# Altium PCB PCB1.PcbDoc (part 2 of 2)
Units mil, origin at the board's own origin, x right, y up, seen from the top; angles counter-clockwise.
Board outline 2100 x 2250 mil, 4 copper layers (Top Layer, GND1, GND2, Bottom Layer), stack 23.756 mil thick; 82 components, 47 nets, 265 pads, 106 vias.
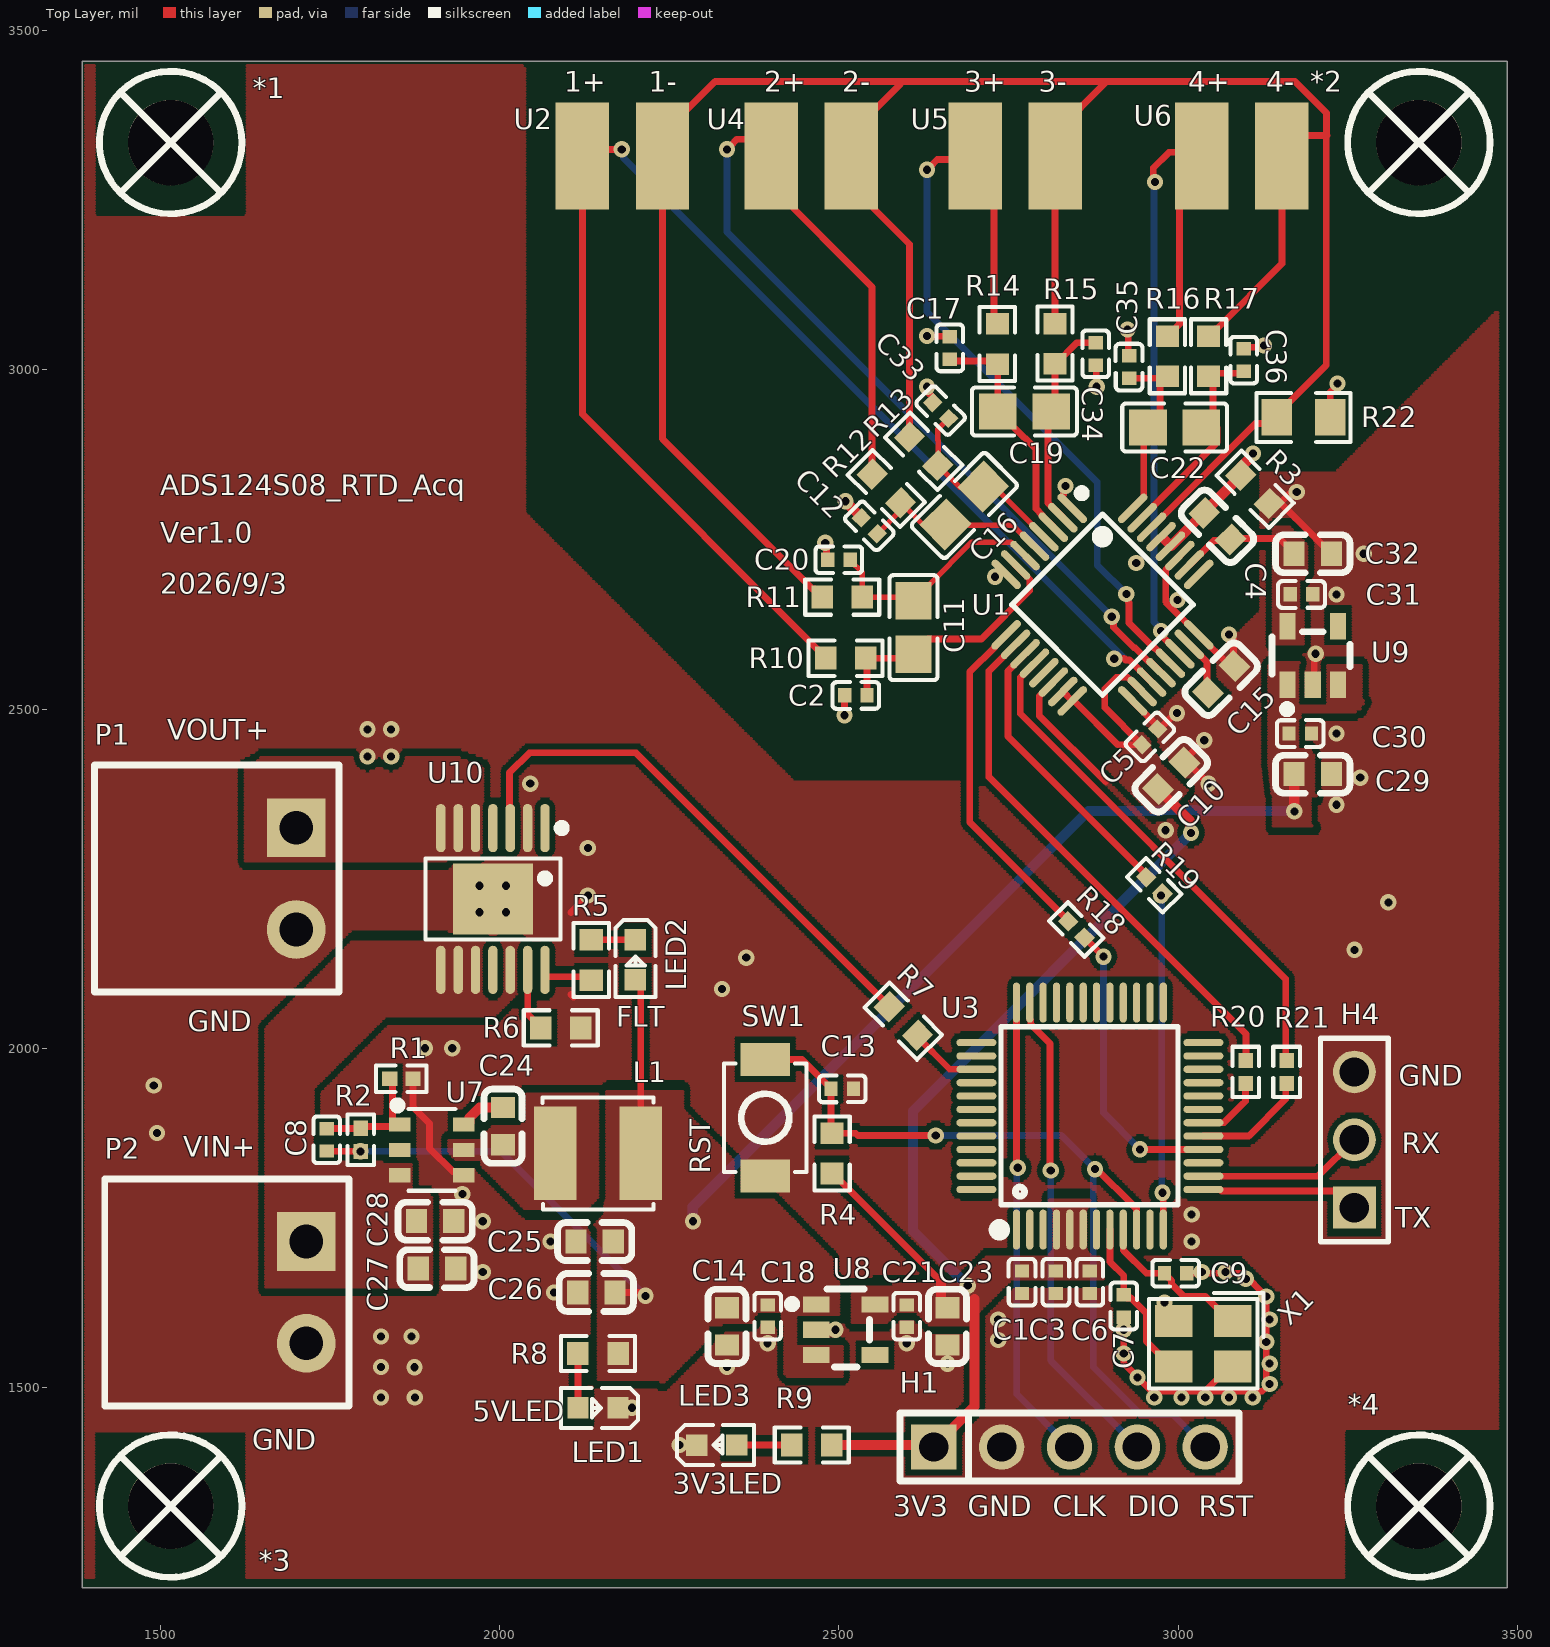
[diagram p0: Top Layer view]

## Polygon pours and split planes (outlines as drawn) (continued)
3V3 on Top Layer "NONET_L-01_P-001" (hatched Horizontal grid 4 track 5, remove dead copper, pour order 3): 2515,1650 2520,1645 2520,1595 2570,1595 2585,1610 2615,1610 2635,1590 2700,1590 2700,1605 2755,1660 2890,1660 2890,1690 2885,1695 2870,1695 2870,1780 2810,1780 2810,1700 2805,1695 2720,1695 2680,1655
GND on Bottom Layer "NONET_L-01_P-001" (hatched Horizontal grid 4 track 5, remove dead copper, pour order 37): 1388.11,3450 1388.11,1222.24 3475,1222.24 3475,3450
GND on GND1 "NONET_L-01_P-001" (hatched Horizontal grid 4 track 5, remove dead copper, pour order 44): 1395,3455 1395,1217.5 3475,1217.5 3475,3455
GND on GND2 "NONET_L-01_P-001" (hatched Horizontal grid 4 track 5, remove dead copper, pour order 43): 1395,3450 1395,1217.5 3475,1217.5 3475,3450

## Other copper
Top Layer:
  pour cut-out: 2028.96,3456.04 2040,3445 2040,2790.44 2434.4,2396.04 2873.96,2396.04 2873.96,2401.04 3118.96,2646.04 3118.96,2851.04 3230.6,2851.04 3468.96,3089.4 3468.96,3446.04 3463.96,3451.04
  pour cut-out: 3247.26,1434.19 3247.26,1214.19 3467.26,1214.19 3467.26,1434.19
  pour cut-out: 1404.1,1431.96 1404.1,1211.96 1624.1,1211.96 1624.1,1431.96
  pour cut-out: 3245,3450 3245,3230 3465,3230 3465,3450
  pour cut-out: 1405,3450 1405,3230 1625,3230 1625,3450
  pour cut-out: 2905,1620 2905,1525 2960,1470 3125,1470 3125,1475 3155,1505 3150,1510 3150,1640 3145,1640 3095,1690 3005,1690
GND1:
  pour cut-out: 3245,1435 3245,1215 3465,1215 3465,1435
  pour cut-out: 1405.68,1431.24 1405.68,1211.24 1625.68,1211.24 1625.68,1431.24
  pour cut-out: 1405,3450 1405,3230 1625,3230 1625,3450
  pour cut-out: 3245,3450 3245,3230 3465,3230 3465,3450
GND2:
  pour cut-out: 3247.26,1434.19 3247.26,1214.19 3467.26,1214.19 3467.26,1434.19
  pour cut-out: 1405.07,1431.23 1405.07,1211.23 1625.07,1211.23 1625.07,1431.23
  pour cut-out: 1405.39,3448.2 1405.39,3228.2 1625.39,3228.2 1625.39,3448.2
  pour cut-out: 3250,3450 3250,3230 3470,3230 3470,3450
Bottom Layer:
  pour cut-out: 3245,3450 3245,3230 3465,3230 3465,3450
  pour cut-out: 1405,3450 1405,3230 1625,3230 1625,3450
  pour cut-out: 1405.07,1431.23 1405.07,1211.23 1625.07,1211.23 1625.07,1431.23
  pour cut-out: 3245,1435 3245,1215 3465,1215 3465,1435

## Silkscreen, mask and mechanical layers (free items; w line width, h text height)
Top Overlay:
  text "1+" at 2095,3410 h30
  text "1-" at 2220,3410 h30
  text "2+" at 2390,3410 h30
  text "2-" at 2505,3410 h30
  text "3+" at 2685,3410 h30
  text "3-" at 2795,3410 h30
  text "4+" at 3015,3410 h30
  text "4-" at 3130,3410 h30
  text "ADS124S08_RTD_Acq" at 1500,2815 h30
  text "Ver1.0" at 1500,2745 h30
  text "2026/9/3" at 1500,2670 h30
  text "VOUT+" at 1510,2455 h30
  text "FLT" at 2171.66,2031.98 h30
  text "GND" at 1540,2025 h30
  text "GND" at 3325,1945 h30
  text "RX" at 3330,1845 h30
  text "VIN+" at 1533.48,1839.77 h30
  text "RST" at 2310.65,1815 h30 r90
  text "TX" at 3320,1735 h30
  text "5VLED" at 1960,1450 h30
  text "GND" at 1635.17,1408.34 h30
  text "3V3LED" at 2255.17,1343.34 h30
  text "3V3" at 2580.52,1310.3 h30
  text "GND" at 2690,1310.3 h30
  text "CLK" at 2815.52,1310.3 h30
  text "DIO" at 2925.52,1310.3 h30
  text "RST" at 3030.52,1310.3 h30
Mechanical 1:
  the board outline again, w10